# Altium PCB sdc-le-02hs.pcbdoc
Units mil, origin at the board's own origin, x right, y up, seen from the top; angles counter-clockwise.
Board outline 1190.9 x 1344.9 mil, 2 copper layers (Top Layer, Bottom Layer); 1 components, 0 nets, 14 pads, 0 vias.
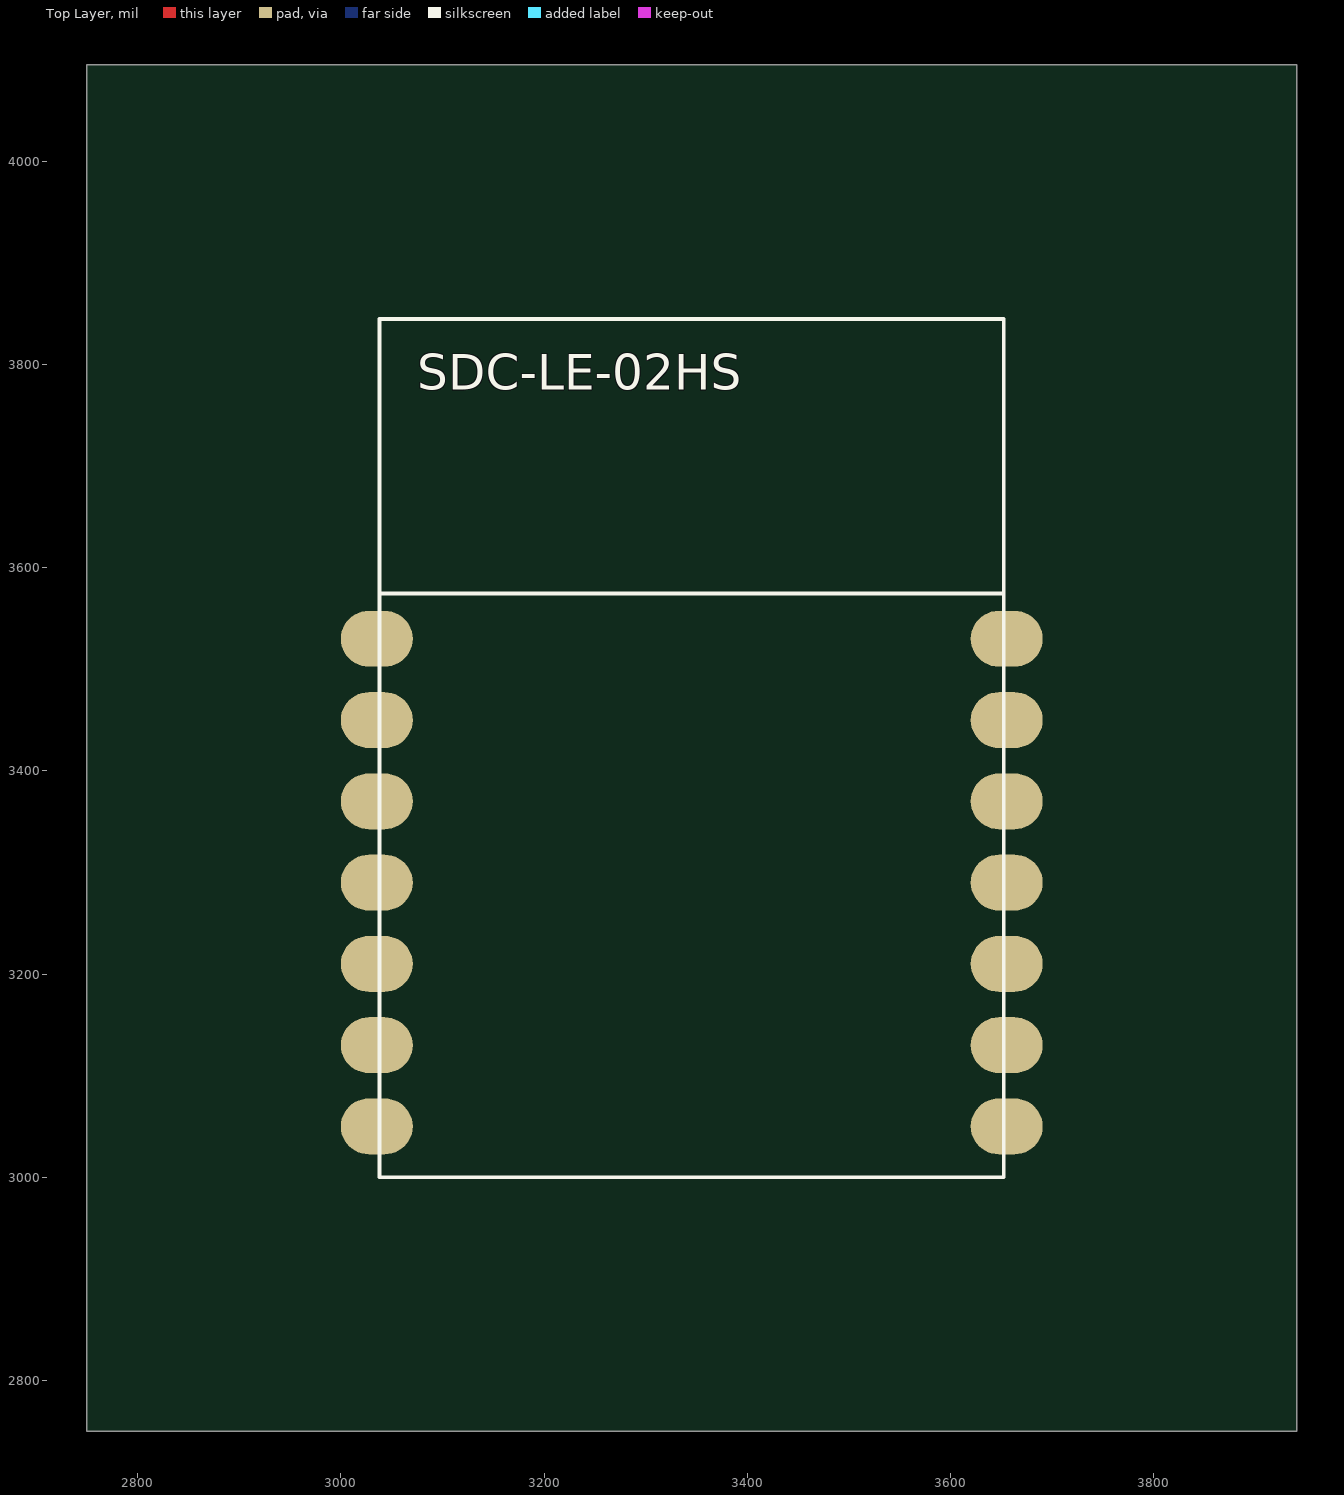
[diagram p0: Top Layer view]
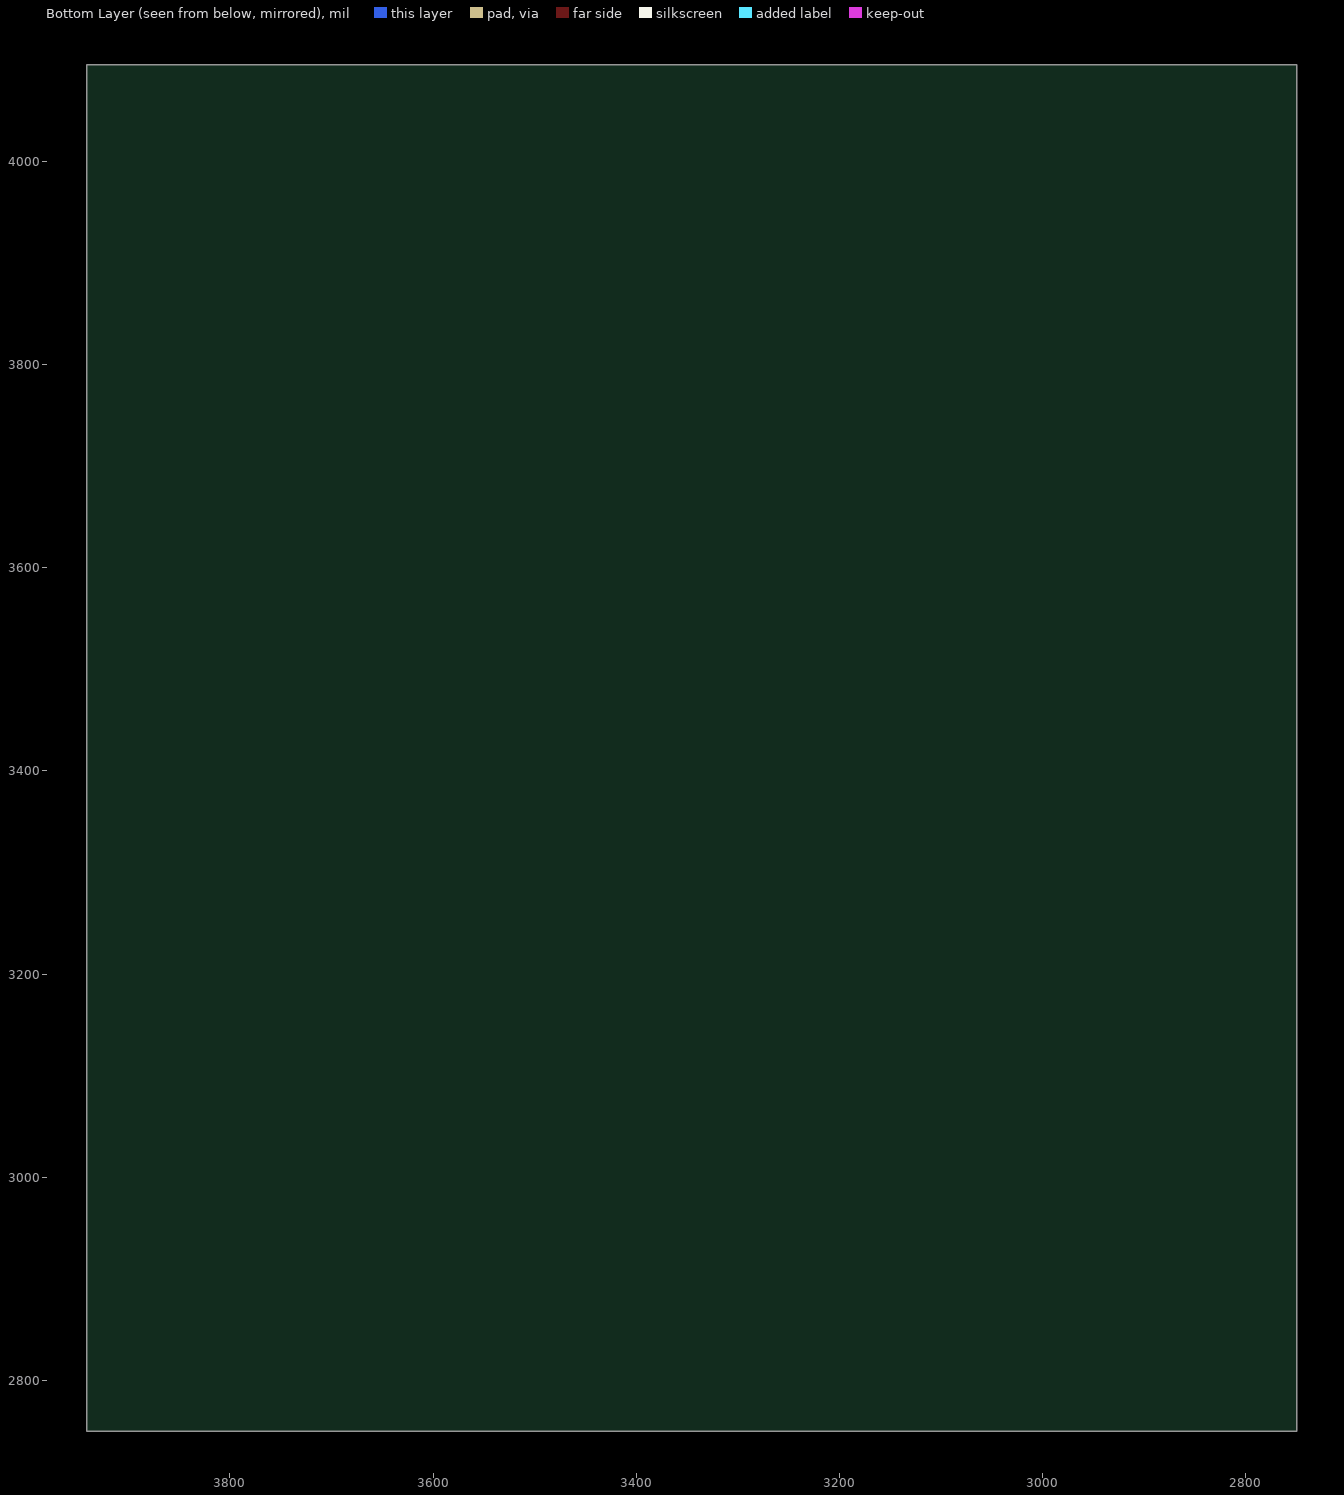
[diagram p1: Bottom Layer view, seen from below]

## Layer stack, top to bottom
Top Solder Mask Layer: solder mask 0.4, Solder Resist, Dk 3.5
Top Layer: signal copper 1.4
Dielectric 1: surface 12.6, FR-4, Dk 4.8
Bottom Layer: signal copper 1.4
Bottom Solder Mask Layer: solder mask 0.4, Solder Resist, Dk 3.5

## Board outline
3940.9,2750 2750,2750 2750,4094.9 3940.9,4094.9

## Components (designator, comment, footprint, x,y, rotation, side; value= is the part's Value field where it differs from the comment)
? "" SDC-LE-02HS(AB56502B模组) 3345.4,3290 r0 top

## Footprints (in the part's own frame and the unit in brackets; to place one, negate y for a bottom-side part, rotate by r counter-clockwise, add the part's x,y. Pads: shape width x height; smd on the part's side, far side on the other; paste and mask are expansions set on the pad)
SDC-LE-02HS(AB56502B模组) [mil]
  oval 70.9x55.1 smd: 1(-310,240) 2(-310,160) 3(-310,80) 4(-310,0) 5(-310,-80) 6(-310,-160) 7(-310,-240) 8(310,-240) 9(310,-160) 10(310,-80) 11(310,0) 12(310,80) 13(310,160) 14(310,240)
  silkscreen extent -307,-290 307,555

## Nets (pads, with @x,y where several pads share a name; then routed paths per layer and width w, separated by ;. In a path a pad name is that pad's centre, name@x,y a point inside that pad or via, vN(x,y) a via of type N, cw(c..) or ccw(c..) an arc to the next point about the centre after c; other vN are vias at no path point)
pads on no net: ?.1 ?.2 ?.3 ?.4 ?.5 ?.6 ?.7 ?.8 ?.9 ?.10 ?.11 ?.12 ?.13 ?.14

## Text inside footprints (layer, text, board x,y; h text height)
?: Top Silkscreen Layer "SDC-LE-02HS" at 3075.4,3775 h35